# Altium PCB Type-C Tester.PcbDoc (part 1 of 2)
Units mil, origin at the board's own origin, x right, y up, seen from the top; angles counter-clockwise.
Board outline 1977.45 x 1150.64 mil, 2 copper layers (Top Layer, Bottom Layer); 31 components, 22 nets, 168 pads, 38 vias.
Unrouted connection lines stored in the file: 2.
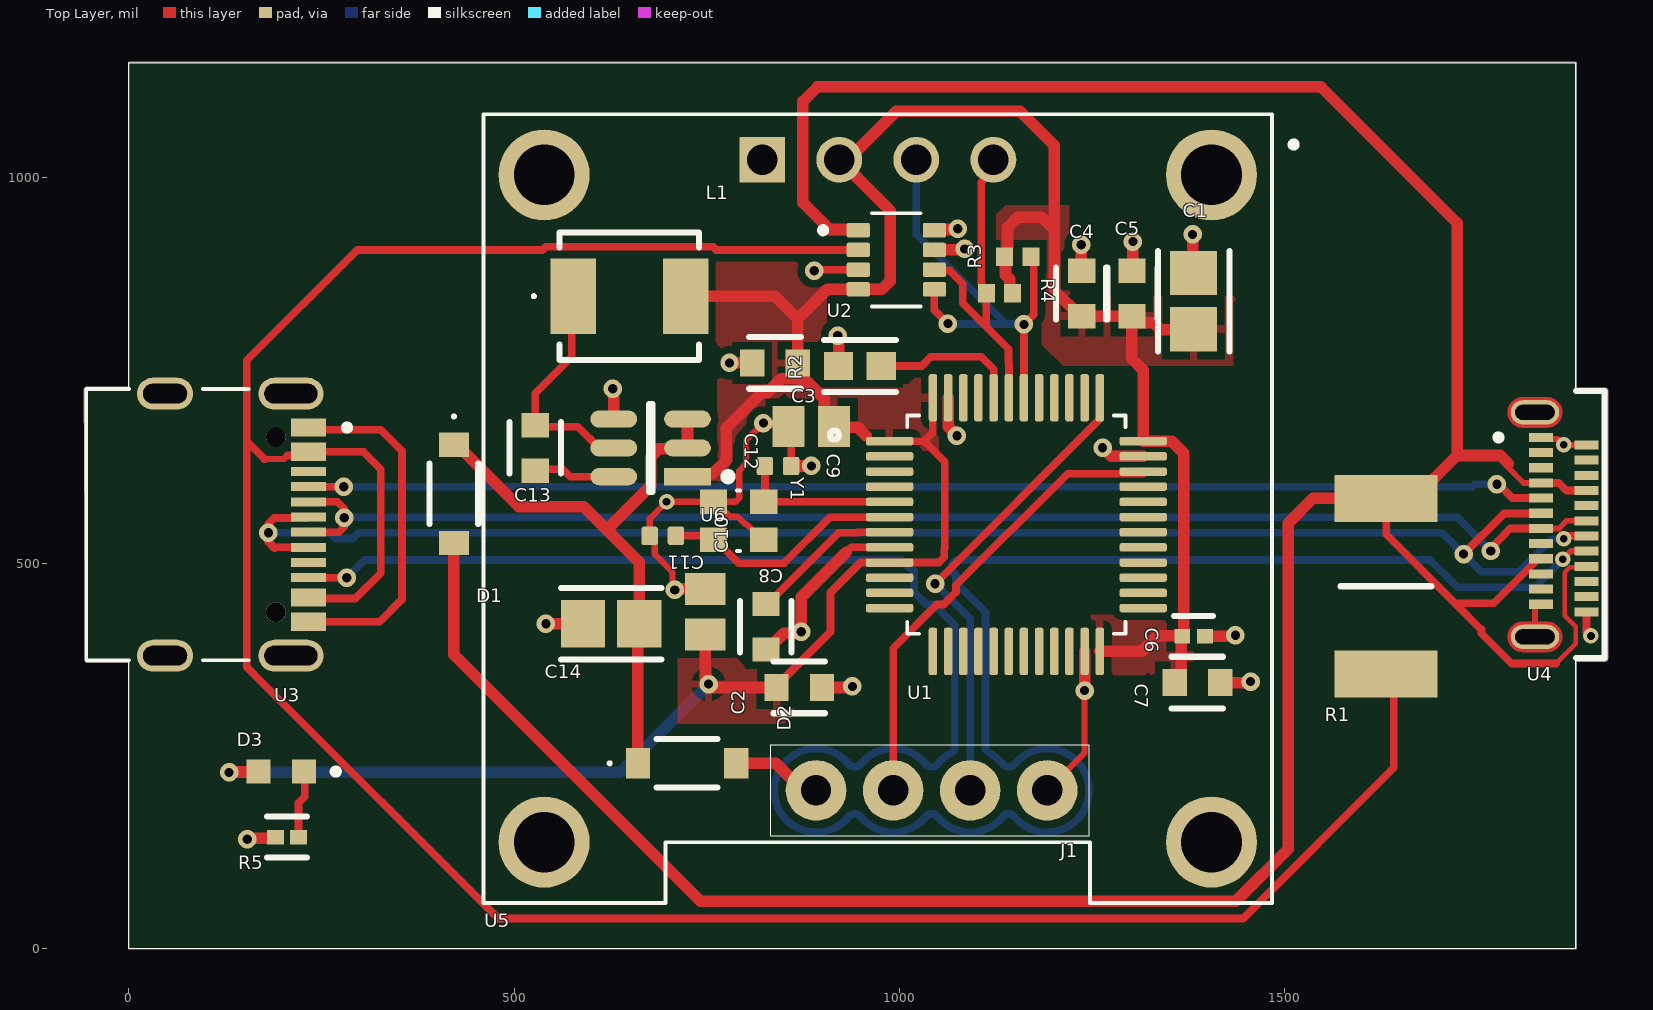
[diagram p0: Top Layer view]
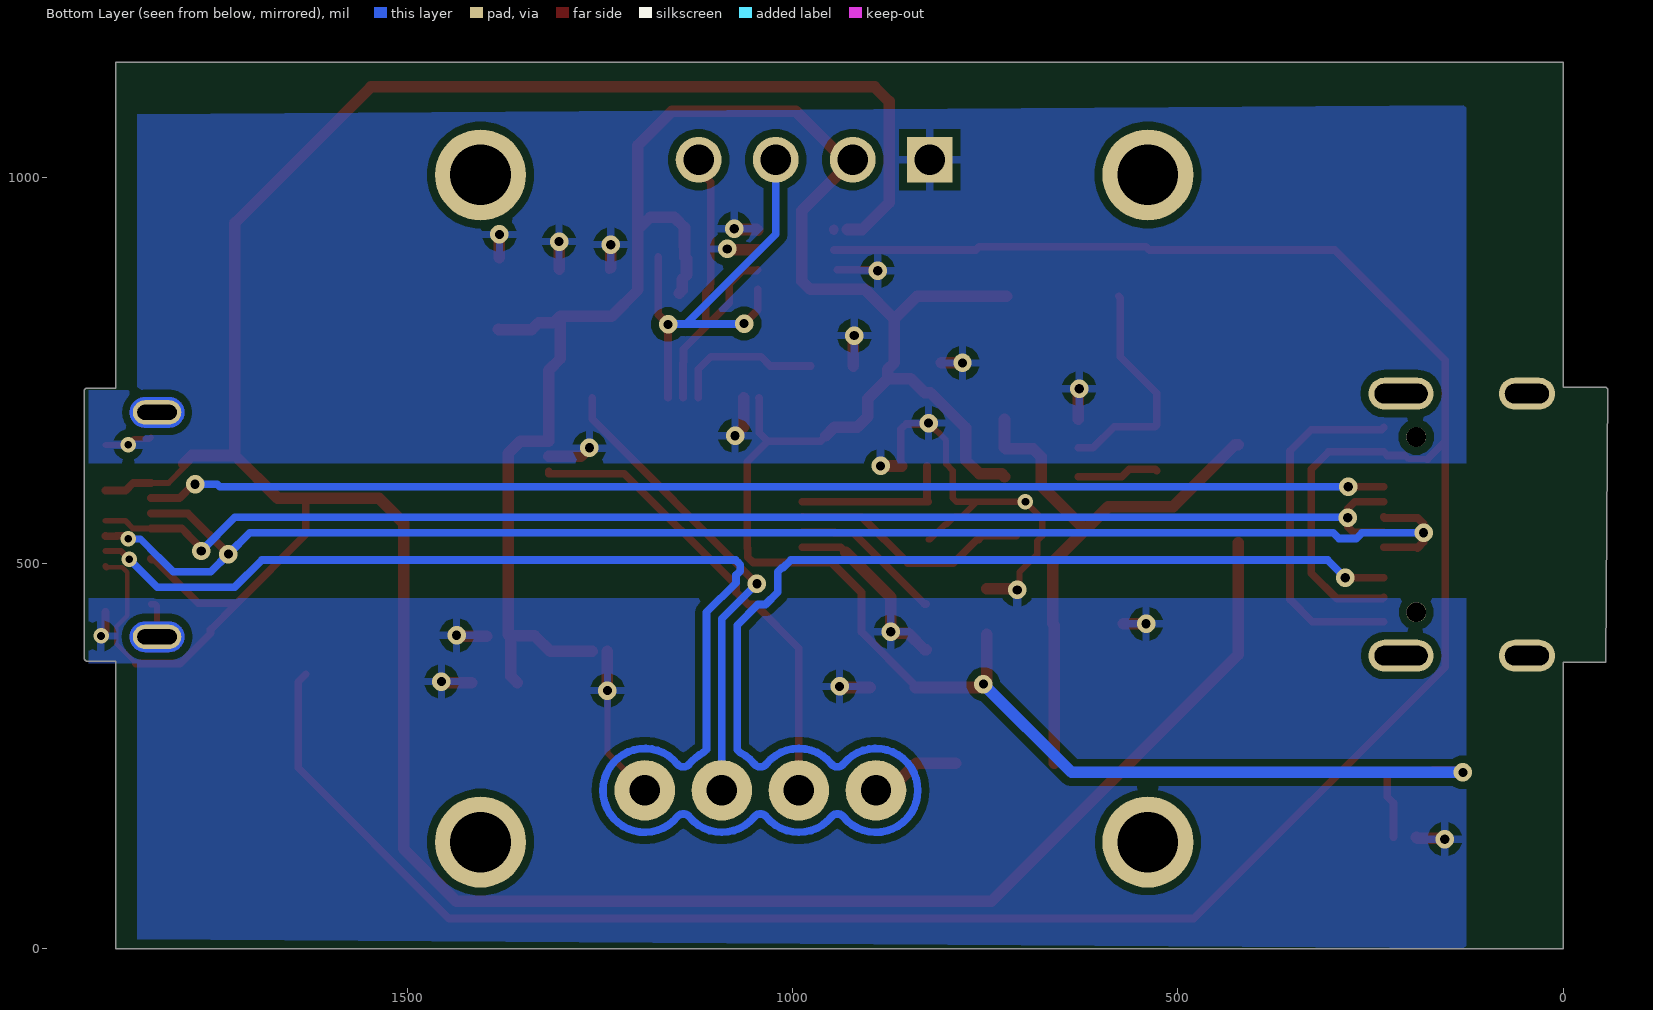
[diagram p1: Bottom Layer view, seen from below]
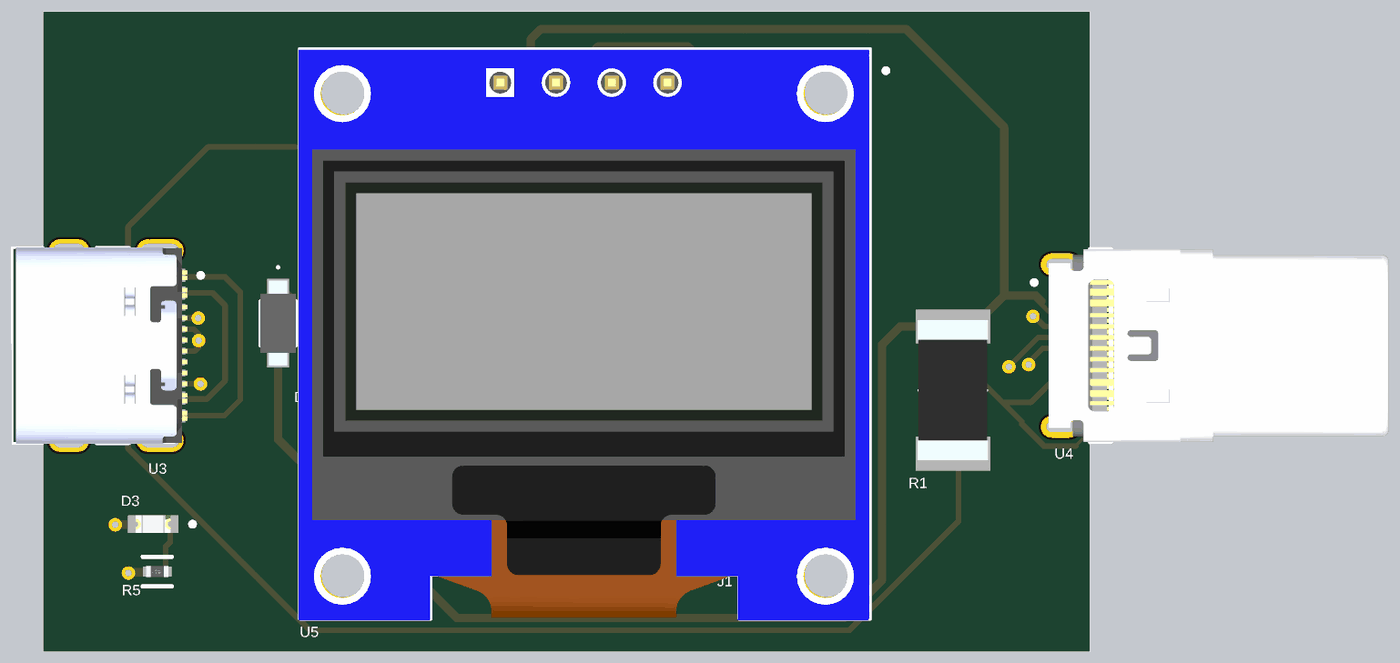
[diagram p2: 3D render of the assembled board from above, using the file's embedded part models]

## Layer stack, top to bottom
Top Solder: solder mask 0.4, Solder Resist, Dk 3.5
Top Layer: signal copper 1.4
Dielectric 1: dielectric 12.6, FR-4, Dk 4.8
Bottom Layer: signal copper 1.4
Bottom Solder: solder mask 0.4, Solder Resist, Dk 3.5

## Board outline
-55.47,371.5 -0.52,371.5 -0.52,0 0,-0.51 1878.11,-0.51 1878.62,0 1878.62,372.82 1915.51,372.82 ccw(c1915.51,376.77) 1919.46,376.77 1919.46,723.23 ccw(c1915.51,723.23) 1915.51,727.18 1878.62,727.18 1878.62,1149.61 1878.11,1150.12 0,1150.12 -0.52,1149.61 -0.52,728.5 -55.47,728.5 -57.99,725.98

## Design rules (kind name [scope] priority, off if disabled: settings)
Clearance [All] p1: gap=10 ignorepadtopadclearanceinfootprint=TRUE except(3.94: SMDPad-SMDPad)
PolygonConnect [All] p1: connectstyle=Relief reliefconductorwidth=10 reliefentries=4 polygonreliefangle="90 Angle" airgapwidth=10
RoutingVias [All] p1: holewidth=12 width=24 viastyle="Through Hole" minholewidth=10 minwidth=20 maxholewidth=34 maxwidth=50
SolderMaskExpansion [All] p1: expansion=0 istentingtop=FALSE
SupplyNets "Schematic Supply Nets_2" [InNet('GND')] p1: voltage=0.000
SupplyNets "Schematic Supply Nets_1" [InNet('+3.3V')] p2: voltage=0.000
SupplyNets "Schematic Supply Nets" [InNet('VIN')] p3: voltage=0.000
Width [All] p1: maxlimit=20 minlimit=6 preferedwidth=10
30 further rules are at their usual default settings.

## Components (designator, comment, footprint, x,y, rotation, side; value= is the part's Value field where it differs from the comment)
C1 "10uF" FP-GRM21B-0_2-e0_2_0_7-IPC_A 1381.89,840 r90 top
C2 "CC0603KRX7R9BB104" FP-CC0603-DA-MFG 870.08,338.58 r180 top value="100 nF"
C3 "CC0603KRX7R9BB104" FP-CC0603-DA-MFG 838.58,759.84 r0 top value="100 nF"
C4 "CC0603KRX7R9BB104" FP-CC0603-DA-MFG 1236.89,850 r270 top value="100 nF"
C5 "CC0603KRX7R9BB104" FP-CC0603-DA-MFG 1301.89,850 r270 top value="100 nF"
C6 "CL05B103KB5NNNC" FP-CL165-IPC_C 1381.89,405 r0 top
C7 "CC0603KRX5R9BB105" FP-CC0603-DA-MFG 1386.89,345 r0 top value="1 uF"
C8 "CC0603KRX7R9BB104" FP-CC0603-DA-MFG 826.77,417.32 r90 top value="100 nF"
C9 "CL05C100JB5NNNC" CAPC1005X55N 842.52,625.98 r180 top value=10p
C10 "CL05C100JB5NNNC" CAPC1005X55N 692.91,535.43 r0 top value=10p
C11 "CL21A226MAQNNNE" CAPC2013X140X45LL15T25 748.03,437.01 r270 top
C12 "CL21A226MAQNNNE" CAPC2013X140X45LL15T25 885.83,677.17 r0 top
C13 "CC0603KRX7R9BB104" FP-CC0603-DA-MFG 527.56,649.61 r90 top value="100 nF"
C14 "10uF" FP-GRM21B-0_2-e0_2_0_7-IPC_A 625.98,421.26 r180 top
D1 "B5819WSL-TP" B5819WSL 421.89,590 r270 top
D2 "B5819WSL-TP" B5819WSL 724.41,240.16 r0 top
D3 "RED" LED_KT-0603R 197.63,229.49 r180 top
J1 "SWD" SWD 891.89,205 r0 top
L1 "4.7μH" SMMS04204R7M 649.61,846.46 r0 top
R1 "50mOhm" RESC6432X110N 1631.89,470 r270 top
R2 "10K" FP-TFCR0603-IPC_B 948.82,755.91 r0 top
R3 "2K2" RESC1005X40N 1153.54,897.64 r0 top
R4 "2K2" RESC1005X40N 1129.92,850.39 r180 top
R5 "CRGCQ0402F1K0" FP-CRGCQ0402-IPC_C 205.2,144.38 r0 top value=1KΩ
U1 "STM32F103C8T6" QFP50P900X900X160-48N 1151.89,550 r0 top locked
U2 "INA219AIDCNR" SOT65P280X145-8N 996.06,893.7 r0 top
U3 "KH-TYPE-C-16P" KINGHELM_KH-TYPE-C-16P 46.89,550 r270 top
U4 "USB4155-03-C" GCT_USB4155-03-C_REVA 1862.36,550 r90 top locked
U5 "OLED" MODULE_DM-OLED096-636 972.05,570.87 r0 top locked
U6 "AP63203WU-7" FP-TSOT26-IPC_A 677.17,649.61 r180 top
Y1 "16MHz" XTAL_ABM10-16.000MHZ-D30-T3 791.34,555.12 r270 top

## Footprints (in the part's own frame and the unit in brackets; to place one, negate y for a bottom-side part, rotate by r counter-clockwise, add the part's x,y. Pads: shape width x height; smd on the part's side, far side on the other; paste and mask are expansions set on the pad)
B5819WSL [mm]
  rect 0.8x1 smd: 1(-1.62,0) 2(1.62,0)
  silkscreen extent -2.6,-0.8 1,0.8, body extent -1.94,-0.8 1.94,0.8, height 1.35
CAPC1005X55N [mm]
  rrect25% 0.54x0.6 smd: 1(-0.432,0) 2(0.432,0)
  body extent -0.5,-0.25 0.5,0.25, height 0.55
CAPC2013X140X45LL15T25 [mm] "Chip Capacitor, 2-Leads, Body 2.00x1.25mm, IPC High Density"
  rect 1.05x1.35 smd: 1(-0.75,0) 2(0.75,0)
  body extent -1.08,-0.7 1.07,0.7, height 1.4
FP-CC0603-DA-MFG [mm]
  rect 0.8x0.9 smd paste+0 mask+0: 1(-0.75,0) 2(0.75,0)
  silkscreen extent -0.85,-0.85 0.85,0.85, body extent -0.8,-0.4 0.8,0.4, height 0.9
FP-CL165-IPC_C [mil]
  rect 20.29x18.6 smd paste+0 mask+0: 1(-14.9,0) 2(14.9,0)
  silkscreen extent -25,-27 25,27, body extent -20,-10 20,10, height 22
FP-CRGCQ0402-IPC_C [mil]
  rect 22.03x18.6 smd paste+0 mask+0: 1(-14.81,0) 2(14.81,0)
  silkscreen extent -26,-27 26,27, body extent -30,-15 30,15, height 10
FP-GRM21B-0_2-e0_2_0_7-IPC_A [mil]
  rect 57.27x61.27 smd paste+0 mask+0: 1(-36.45,0) 2(36.45,0)
  silkscreen extent -65,-46 65,46, body extent -39,-25 39,25, height 57
FP-TFCR0603-IPC_B [mil]
  rect 37.72x35.91 smd paste+0 mask+0: 1(-27.64,0) 2(27.64,0)
  silkscreen extent -46,-34 46,34, body extent -31,-16 31,16, height 22
FP-TSOT26-IPC_A [mm]
  rect 1.54x0.566 smd paste+0 mask+0: 1(-1.216,0.95)
  rrect100% 1.54x0.566 smd paste+0 mask+0: 2(-1.216,0) 3(-1.216,-0.95) 4(1.216,-0.95) 5(1.216,0) 6(1.216,0.95)
  silkscreen extent -2.68,-1.45 0.05,1.45, body extent -1.4,-1.45 1.4,1.45, height 1
GCT_USB4155-03-C_REVA [mm]
  rect 0.3x0.8 smd: A1(2.875,0.75) A2(2.375,0.75) A3(1.875,0.75) A4(1.375,0.75) A5(0.875,0.75) A6(0.375,0.75) A7(-0.125,0.75) A8(-0.625,0.75) A9(-1.125,0.75) A10(-1.625,0.75) A11(-2.125,0.75) A12(-2.625,0.75) B1(-2.875,-0.75) B2(-2.375,-0.75) B3(-1.875,-0.75) B4(-1.375,-0.75) B5(-0.875,-0.75) B6(-0.375,-0.75) B7(0.125,-0.75) B8(0.625,-0.75) B9(1.125,-0.75) B10(1.625,-0.75) B11(2.125,-0.75) B12(2.625,-0.75)
  oval 0.8x1.6 hole 0.5 slot 1.3 at 90 deg mask+0: S1(-3.7,0.95) S2(3.7,0.95)
  Top Layer region: -3.674,1.849 -3.648,1.847 -3.622,1.844 -3.596,1.839 -3.571,1.833 -3.545,1.826 -3.521,1.817 -3.497,1.807 -3.473,1.796 -3.45,1.783 -3.428,1.769 -3.406,1.755 -3.385,1.739 -3.365,1.722 -3.346,1.704 -3.328,1.685 -3.311,1.665 -3.295,1.644 -3.281,1.622 -3.267,1.6 -3.254,1.577 -3.243,1.553 -3.233,1.529 -3.224,1.505 -3.217,1.479 -3.211,1.454 -3.206,1.428 -3.203,1.402 -3.201,1.376 -3.2,1.35 -3.2,0.55 -3.201,0.524 -3.203,0.498 -3.206,0.472 -3.211,0.446 -3.217,0.421 -3.224,0.395 -3.233,0.371 -3.243,0.347 -3.254,0.323 -3.267,0.3 -3.281,0.278 -3.295,0.256 -3.311,0.235 -3.328,0.215 -3.346,0.196 -3.365,0.178 -3.385,0.161 -3.406,0.145 -3.428,0.131 -3.45,0.117 -3.473,0.104 -3.497,0.093 -3.521,0.083 -3.545,0.074 -3.571,0.067 -3.596,0.061 -3.622,0.056 -3.648,0.053 -3.674,0.051 -3.7,0.05 -3.726,0.051 -3.752,0.053 -3.778,0.056 -3.804,0.061 -3.829,0.067 -3.855,0.074 -3.879,0.083 -3.903,0.093 -3.927,0.104 -3.95,0.117 -3.972,0.131 -3.994,0.145 -4.015,0.161 -4.035,0.178 -4.054,0.196 -4.072,0.215 -4.089,0.235 -4.105,0.256 -4.119,0.278 -4.133,0.3 -4.146,0.323 -4.157,0.347 -4.167,0.371 -4.176,0.395 -4.183,0.421 -4.189,0.446 -4.194,0.472 -4.197,0.498 -4.199,0.524 -4.2,0.55 -4.2,1.35 -4.199,1.376 -4.197,1.402 -4.194,1.428 -4.189,1.454 -4.183,1.479 -4.176,1.505 -4.167,1.529 -4.157,1.553 -4.146,1.577 -4.133,1.6 -4.119,1.622 -4.105,1.644 -4.089,1.665 -4.072,1.685 -4.054,1.704 -4.035,1.722 -4.015,1.739 -3.994,1.755 -3.972,1.769 -3.95,1.783 -3.927,1.796 -3.903,1.807 -3.879,1.817 -3.855,1.826 -3.829,1.833 -3.804,1.839 -3.778,1.844 -3.752,1.847 -3.726,1.849 -3.7,1.85
  Top Layer region: 3.726,1.849 3.752,1.847 3.778,1.844 3.804,1.839 3.829,1.833 3.855,1.826 3.879,1.817 3.903,1.807 3.927,1.796 3.95,1.783 3.972,1.769 3.994,1.755 4.015,1.739 4.035,1.722 4.054,1.704 4.072,1.685 4.089,1.665 4.105,1.644 4.119,1.622 4.133,1.6 4.146,1.577 4.157,1.553 4.167,1.529 4.176,1.505 4.183,1.479 4.189,1.454 4.194,1.428 4.197,1.402 4.199,1.376 4.2,1.35 4.2,0.55 4.199,0.524 4.197,0.498 4.194,0.472 4.189,0.446 4.183,0.421 4.176,0.395 4.167,0.371 4.157,0.347 4.146,0.323 4.133,0.3 4.119,0.278 4.105,0.256 4.089,0.235 4.072,0.215 4.054,0.196 4.035,0.178 4.015,0.161 3.994,0.145 3.972,0.131 3.95,0.117 3.927,0.104 3.903,0.093 3.879,0.083 3.855,0.074 3.829,0.067 3.804,0.061 3.778,0.056 3.752,0.053 3.726,0.051 3.7,0.05 3.674,0.051 3.648,0.053 3.622,0.056 3.596,0.061 3.571,0.067 3.545,0.074 3.521,0.083 3.497,0.093 3.473,0.104 3.45,0.117 3.428,0.131 3.406,0.145 3.385,0.161 3.365,0.178 3.346,0.196 3.328,0.215 3.311,0.235 3.295,0.256 3.281,0.278 3.267,0.3 3.254,0.323 3.243,0.347 3.233,0.371 3.224,0.395 3.217,0.421 3.211,0.446 3.206,0.472 3.203,0.498 3.201,0.524 3.2,0.55 3.2,1.35 3.201,1.376 3.203,1.402 3.206,1.428 3.211,1.454 3.217,1.479 3.224,1.505 3.233,1.529 3.243,1.553 3.254,1.577 3.267,1.6 3.281,1.622 3.295,1.644 3.311,1.665 3.328,1.685 3.346,1.704 3.365,1.722 3.385,1.739 3.406,1.755 3.428,1.769 3.45,1.783 3.473,1.796 3.497,1.807 3.521,1.817 3.545,1.826 3.571,1.833 3.596,1.839 3.622,1.844 3.648,1.847 3.674,1.849 3.7,1.85
  Bottom Layer region: -3.674,1.849 -3.648,1.847 -3.622,1.844 -3.596,1.839 -3.571,1.833 -3.545,1.826 -3.521,1.817 -3.497,1.807 -3.473,1.796 -3.45,1.783 -3.428,1.769 -3.406,1.755 -3.385,1.739 -3.365,1.722 -3.346,1.704 -3.328,1.685 -3.311,1.665 -3.295,1.644 -3.281,1.622 -3.267,1.6 -3.254,1.577 -3.243,1.553 -3.233,1.529 -3.224,1.505 -3.217,1.479 -3.211,1.454 -3.206,1.428 -3.203,1.402 -3.201,1.376 -3.2,1.35 -3.2,0.55 -3.201,0.524 -3.203,0.498 -3.206,0.472 -3.211,0.446 -3.217,0.421 -3.224,0.395 -3.233,0.371 -3.243,0.347 -3.254,0.323 -3.267,0.3 -3.281,0.278 -3.295,0.256 -3.311,0.235 -3.328,0.215 -3.346,0.196 -3.365,0.178 -3.385,0.161 -3.406,0.145 -3.428,0.131 -3.45,0.117 -3.473,0.104 -3.497,0.093 -3.521,0.083 -3.545,0.074 -3.571,0.067 -3.596,0.061 -3.622,0.056 -3.648,0.053 -3.674,0.051 -3.7,0.05 -3.726,0.051 -3.752,0.053 -3.778,0.056 -3.804,0.061 -3.829,0.067 -3.855,0.074 -3.879,0.083 -3.903,0.093 -3.927,0.104 -3.95,0.117 -3.972,0.131 -3.994,0.145 -4.015,0.161 -4.035,0.178 -4.054,0.196 -4.072,0.215 -4.089,0.235 -4.105,0.256 -4.119,0.278 -4.133,0.3 -4.146,0.323 -4.157,0.347 -4.167,0.371 -4.176,0.395 -4.183,0.421 -4.189,0.446 -4.194,0.472 -4.197,0.498 -4.199,0.524 -4.2,0.55 -4.2,1.35 -4.199,1.376 -4.197,1.402 -4.194,1.428 -4.189,1.454 -4.183,1.479 -4.176,1.505 -4.167,1.529 -4.157,1.553 -4.146,1.577 -4.133,1.6 -4.119,1.622 -4.105,1.644 -4.089,1.665 -4.072,1.685 -4.054,1.704 -4.035,1.722 -4.015,1.739 -3.994,1.755 -3.972,1.769 -3.95,1.783 -3.927,1.796 -3.903,1.807 -3.879,1.817 -3.855,1.826 -3.829,1.833 -3.804,1.839 -3.778,1.844 -3.752,1.847 -3.726,1.849 -3.7,1.85
  Bottom Layer region: 3.726,1.849 3.752,1.847 3.778,1.844 3.804,1.839 3.829,1.833 3.855,1.826 3.879,1.817 3.903,1.807 3.927,1.796 3.95,1.783 3.972,1.769 3.994,1.755 4.015,1.739 4.035,1.722 4.054,1.704 4.072,1.685 4.089,1.665 4.105,1.644 4.119,1.622 4.133,1.6 4.146,1.577 4.157,1.553 4.167,1.529 4.176,1.505 4.183,1.479 4.189,1.454 4.194,1.428 4.197,1.402 4.199,1.376 4.2,1.35 4.2,0.55 4.199,0.524 4.197,0.498 4.194,0.472 4.189,0.446 4.183,0.421 4.176,0.395 4.167,0.371 4.157,0.347 4.146,0.323 4.133,0.3 4.119,0.278 4.105,0.256 4.089,0.235 4.072,0.215 4.054,0.196 4.035,0.178 4.015,0.161 3.994,0.145 3.972,0.131 3.95,0.117 3.927,0.104 3.903,0.093 3.879,0.083 3.855,0.074 3.829,0.067 3.804,0.061 3.778,0.056 3.752,0.053 3.726,0.051 3.7,0.05 3.674,0.051 3.648,0.053 3.622,0.056 3.596,0.061 3.571,0.067 3.545,0.074 3.521,0.083 3.497,0.093 3.473,0.104 3.45,0.117 3.428,0.131 3.406,0.145 3.385,0.161 3.365,0.178 3.346,0.196 3.328,0.215 3.311,0.235 3.295,0.256 3.281,0.278 3.267,0.3 3.254,0.323 3.243,0.347 3.233,0.371 3.224,0.395 3.217,0.421 3.211,0.446 3.206,0.472 3.203,0.498 3.201,0.524 3.2,0.55 3.2,1.35 3.201,1.376 3.203,1.402 3.206,1.428 3.211,1.454 3.217,1.479 3.224,1.505 3.233,1.529 3.243,1.553 3.254,1.577 3.267,1.6 3.281,1.622 3.295,1.644 3.311,1.665 3.328,1.685 3.346,1.704 3.365,1.722 3.385,1.739 3.406,1.755 3.428,1.769 3.45,1.783 3.473,1.796 3.497,1.807 3.521,1.817 3.545,1.826 3.571,1.833 3.596,1.839 3.622,1.844 3.648,1.847 3.674,1.849 3.7,1.85
  silkscreen extent -4.4,-1.35 4.4,2.25, body extent -4.4,-14 4.4,1.5, height 1.45
KINGHELM_KH-TYPE-C-16P [mm]
  rect 0.6x1.15 smd paste+0 mask+0: A1B12(-3.2,4.725) A4B9(-2.4,4.725) A9B4(2.4,4.725) A12B1(3.2,4.725)
  rect 0.3x1.15 smd paste+0 mask+0: A5(-1.25,4.725) A6(-0.25,4.725) A7(0.25,4.725) A8(1.25,4.725) B5(1.75,4.725) B6(0.75,4.725) B7(-0.75,4.725) B8(-1.75,4.725)
  oval 1.05x1.85 hole 0.65 slot 1.45 at 90 deg mask+0.102: SH1(-4.32,0) SH2(4.32,0)
  oval 1.05x2.15 hole 0.65 slot 1.75 at 90 deg mask+0.102: SH3(-4.32,4.15) SH4(4.32,4.15)
  round 0.65 hole 0.65 unplated mask+0: ""(-2.89,3.65) ""(2.89,3.65)
  silkscreen extent -4.47,-2.6 4.47,6.1, body extent -4.47,-2.41 4.47,5.41, height 3.41
LED_KT-0603R [mm]
  rect 0.8x0.8 smd: A(0.75,0) C(-0.75,0)
  silkscreen extent -1.9,-0.1 -1.7,0.1, body extent -0.8,-0.4 0.8,0.4, height 0.65
MODULE_DM-OLED096-636 [mm]
  rect 1.508x1.508 / inner round 1.508 / far side rect 1.508x1.508 hole 1: 1(-3.81,11.5)
  round 1.508 hole 1: 2(-1.27,11.5) 3(1.27,11.5) 4(3.81,11.5)
  round 3 hole 2: S1(-11,11) S2(11,11) S3(11,-11) S4(-11,-11)
  silkscreen extent -13,-13 13.81,13, body extent -13.05,-13.05 12.95,12.95, height 5.66
QFP50P900X900X160-48N [mm]
  rrect50% 1.56x0.28 smd: 1(-4.18,2.75) 2(-4.18,2.25) 3(-4.18,1.75) 4(-4.18,1.25) 5(-4.18,0.75) 6(-4.18,0.25) 7(-4.18,-0.25) 8(-4.18,-0.75) 9(-4.18,-1.25) 10(-4.18,-1.75) 11(-4.18,-2.25) 12(-4.18,-2.75) 25(4.18,-2.75) 26(4.18,-2.25) 27(4.18,-1.75) 28(4.18,-1.25) 29(4.18,-0.75) 30(4.18,-0.25) 31(4.18,0.25) 32(4.18,0.75) 33(4.18,1.25) 34(4.18,1.75) 35(4.18,2.25) 36(4.18,2.75)
  rrect50% 0.28x1.56 smd: 13(-2.75,-4.18) 14(-2.25,-4.18) 15(-1.75,-4.18) 16(-1.25,-4.18) 17(-0.75,-4.18) 18(-0.25,-4.18) 19(0.25,-4.18) 20(0.75,-4.18) 21(1.25,-4.18) 22(1.75,-4.18) 23(2.25,-4.18) 24(2.75,-4.18) 37(2.75,4.18) 38(2.25,4.18) 39(1.75,4.18) 40(1.25,4.18) 41(0.75,4.18) 42(0.25,4.18) 43(-0.25,4.18) 44(-0.75,4.18) 45(-1.25,4.18) 46(-1.75,4.18) 47(-2.25,4.18) 48(-2.75,4.18)
  silkscreen extent -6.15,-3.6 3.6,3.6, body extent -4.5,-4.48 4.5,4.52, height 1.48
RESC1005X40N [mm]
  rect 0.56x0.6 smd: 1(-0.435,0) 2(0.435,0)
  body extent -0.5,-0.25 0.5,0.25, height 0.35
RESC6432X110N [mm]
  rect 1.55x3.4 smd: 1(-2.9,0) 2(2.9,0)
  silkscreen extent 0,-1.5 0,1.5, body extent -3.2,-1.6 3.2,1.6, height 1.1
SMMS04204R7M [mm]
  rect 1.5x2.5 smd: 1(-1.85,0) 2(1.85,0)
  silkscreen extent -3.2,-2.1 2.3,2.1, body extent -2.45,-2.1 2.45,2.1, height 2.1
SOT65P280X145-8N [mm]
  rrect25% 0.762x0.48 smd: 1(-1.255,0.975) 2(-1.255,0.325) 3(-1.255,-0.325) 4(-1.255,-0.975) 5(1.255,-0.975) 6(1.255,-0.325) 7(1.255,0.325) 8(1.255,0.975)
  silkscreen extent -2.51,-1.54 0.8,1.53, body extent -1.4,-1.45 1.4,1.45, height 1.45
SWD [mm]
  round 2 hole 1: 1(0,0) 2(2.54,0) 3(5.08,0) 4(7.62,0)
  silkscreen extent -1.5,-1.5 9,1.5
XTAL_ABM10-16.000MHZ-D30-T3 [mm]
  rect 0.8x0.9 smd: 1(-0.625,0.825) 2(-0.625,-0.825) 3(0.625,-0.825) 4(0.625,0.825)
  silkscreen extent -1,-0.06 1,0.06, body extent -1.25,-1 1.25,1, height 0.7

## Part data
C1 C14: library part CMP-06035-004402-1, "Chip Multilayer Ceramic Capacitors for General Purpose, 0805, 10uF, X5R, 15%, 10%, 50V", Dielectric=X5R, LCSC PART=C440198, Tolerance=10%, Voltage Rating (DC)=50V, Capacitance=10uF, Length=2mm, Thickness=1.25mm, Width=1.25mm
C2 C3 C4 C5 C8 C13: library part CMP-2100-03601-2, "CAP CER 0.1UF 50V X7R 0603", Capacitance="100 nF", LCSC PART=C14663, Manufacturer=YAGEO, Package=CC0603-DA, Temperature="-55°C to +125°C", Temperature Characteristic=X7R, Temperature Coefficient=15%, Temperature Range High=+125°C, Temperature Range Low=-55°C, Tolerance=0.1, Voltage="50 V", Automotive=No, Category=Cap, ComponentLink2Description=Datasheet, ComponentLink2URL=http://www.yageo.com/documents/recent/UPY-GPHC_X7R_6.3V-to-50V_18.pdf, Device Class L1="Passive Components", Device Class L2=Capacitors, Device Class L3="Ceramic Capacitors", Digikey Description="CAP CER 0.1UF 50V X7R 0603", Footprint Url=http://www.yageo.com/exep/pages/download/literatures/UPY-C_GEN_24.pdf, Height=0.9mm, Lead Free=Yes, Manufacturer Part Number=CC0603KRX7R9BB104, Material=Ceramic, Mouser Description="Multilayer Ceramic Capacitor, CC Series, 0.1 - F, - 10%, X7R, 50 V, 0603 [1608 Metric]", Octopart=https://octopart.com/cc0603krx7r9bb104-yageo-42244635, RoHS=TRUE, Voltage Rating="50 V"
C6: library part CMP-13271-000387-1, "Cap Ceramic 10nF 50V X7R ±10% SMD 0402 +125°C Paper T/R", Capacitance=10nF, Case Code (Imperial)=0402, Case Code (Metric)=1005, Dielectric=X7R, Max Operating Temperature=125°C, Min Operating Temperature=-55°C, Package Quantity=1, Tolerance=10%, Voltage=50V, Case/Package=0402, Contact Plating=Tin, Depth=0.5mm, Height=0.5mm, Lead Free="Lead Free", Length=1mm, Material=Ceramic, Mount="Surface Mount", Packaging="Tape and Reel", Radiation Hardening=No, Thickness=0.022inch, Voltage Rating=50V, Voltage Rating (DC)=50V, Width=0.02inch
C7: library part CMP-03422-001112-1, "CAP CER 1UF 50V X5R 0603", Capacitance="1 uF", Manufacturer=YAGEO, Package=CC0603-DA, Temperature="-55°C to +125°C", Temperature Characteristic=X5R, Temperature Coefficient=15%, Temperature Range High=+125°C, Temperature Range Low=-55°C, Tolerance=0.1, Voltage="50 V", Automotive=No, Category=Cap, ComponentLink2Description=Datasheet, ComponentLink2URL=http://www.yageo.com/documents/recent/UPY-GPHC_X7R_6.3V-to-50V_18.pdf, Device Class L1="Passive Components", Device Class L2=Capacitors, Device Class L3="Ceramic Capacitors", Digikey Description="CAP CER 1UF 50V X5R 0603", Footprint Url=http://www.yageo.com/exep/pages/download/literatures/UPY-C_GEN_24.pdf, Height=0.9mm, Lead Free=Yes, Manufacturer Part Number=CC0603KRX5R9BB105, Material=Ceramic, Mouser Description="Multilayer Ceramic Capacitors MLCC - SMD/SMT 1M pF 10% 50 Volts", Octopart=https://octopart.com/cc0603krx5r9bb105-yageo-48690813, RoHS=TRUE, Voltage Rating="50 V"
C9 C10: "10 pF Â±5% 50V Ceramic Capacitor C0G, NP0 0402 (1005 Metric)", Package="SMD-2-2 Samsung", Check_prices=https://www.snapeda.com/parts/CL05C100JB5NNNC/Samsung/view-part/?ref=eda, MF="Samsung Electro-Mechanics", MP=CL05C100JB5NNNC, SnapEDA_Link=https://www.snapeda.com/parts/CL05C100JB5NNNC/Samsung/view-part/?ref=snap
C11 C12: library part CMP-2000-06104-1, "Multi-layer Ceramic Capacitor, 22 uF, -55 to 85 degC, 2-Pin SMD (0805), RoHS, Tape and Reel", Capacitance=22µF, LCSC PART=C45783, Manufacturer="Samsung Electro-Mechanics", Operating Temperature=-55°C~85°C, Package / Case=0805(2012Metric), Package Description="2-Pin Surface Mount Device, Body 2.0 x 1.25 mm", Package Reference=0805, Ratings=-, Standard Package=2,000, Temperature Coefficient=X5R, Tolerance=±20%, Voltage - Rated=25V, Applications=GeneralPurpose, Category=Capacitors, Datasheet URL=http://datasheet.octopart.com/CL21A226MAQNNNE-Samsung-datasheet-48647558.pdf, Datasheet Version=07/2015, Family=CeramicCapacitors, Featured Product=Multi-LayerCeramicCapacitors, Features=-, Height - Seated (Max)=-, Lead Spacing=-, Lead Style=-, Manufacturer URL=http://www.samsungsem.com/global/index.jsp, Mounting Technology=SurfaceMount, Mounting Type=SurfaceMount,MLCC, Online Catalog=CLSeries,HighCapacitance, Other Names=1276-2908-2, Packaging=Tape&Reel(TR), Product Training Modules=HighCapMLCCFamily, RoHS Information=MLCCRoHS2Compliance, Series=CL, Size / Dimension="0.079\"Lx0.049\"W(2.00mmx1.25mm)", Thickness (Max)="0.055\"(1.40mm)"
D1 D2: "Rectifier Diode, Schottky, 1 Phase, 1 Element, 1A, 40V V(RRM), Silicon", Forward Voltage=600mV, Manufacturer=MCC, Max Forward Surge Current (Ifsm)=10A, Max Operating Temperature=125°C, Max Output current=1A, Max Power Dissipation=250mW, Min Operating Temperature=-65°C, Peak Reverse Current=50µA, Reverse Standoff Voltage=40V, Category="Rectifier Diodes", China RoHS=Compliant, Lifecycle Status=Production, Manufacturer Part Number=B5819WSL-TP, Number of Elements=1, Number of Terminals=2, Pricing="3000=0.0379, 9000=0.037, 15000=0.0366, 45000=0.0357, 75000=0.0349 (USD)", REACH SVHC=Unaffected, RoHS=Compliant, Stock=3000, Supplier="Future Electronics", Supplier Part Number=B5819WSL-TP
D3: library part KT-0603R, "Unchecked KT-0603R 615nm~630nm 120° 1.9V~2.2V red 0603 SMD mount 1.6mm*800μm*700μm Uncategorized"
L1: library part SMMS0420-4R7M, "Manufacturer Part Description Category Supply Info / Unchecked SMMS0420-4R7M 4.7μH ±20% 3A Inductor Uncategorized"
R1: library part HoJLR2512-2W-50mR-1%, "Unchecked HOJLR2512-2W-50MR-1% 2512 Alloy Resistor, 0.05Ω ±1%, 50ppm, 2W Chip SMD Resistors"
R2: library part CMP-250906-158435-1, "RES Thin Film,  10kΩ, 1%, 0.1W, 100ppm/°C, 0603"
R3 R4: library part 0402WGF2201TCE, "Unchecked RND 1550402WGF2201TCE SMD Resistor Dimensions L x W x H: 1 x 0.5 x 0.35 mm Temperature range: -55 ... 155 °C Construction form: 0402... Uncategorized      100ppm/°C"
R5: library part CMP-03211-006314-1, "CRGCQ0402 1KΩ 1% ±100ppm/°C 50V", Ambient Temperature Range High=+70°C, Manufacturer="TE Connectivity", Package=CRGCQ0402, Power Rating=0.0625W, Resistance=1KΩ, Temperature="-55°C to +155°C", Temperature Coefficient=±100ppm/°C, Temperature Range High=+155°C, Temperature Range Low=-55°C, Tolerance=0.01, Voltage Rating=50V, Automotive=Yes, Category=Res, ComponentLink2Description=Datasheet, ComponentLink2URL=https://www.te.com/commerce/DocumentDelivery/DDEController?Action=showdoc&DocId=Data+Sheet%7F1773204-3%7F1%7Fpdf%7FEnglish%7FENG_DS_1773204-3_1.pdf%7F4-2176347-694, Composition="Thick Film", Device Class L1="Passive Components", Device Class L2=Resistors, Device Class L3="Chip SMD Resistors", Height=0.4mm, Ipc Land Pattern Name=RESC10050X35, Lead Free=Yes, Manufacturer Part Number=CRGCQ0402F1K0, Octopart=https://octopart.com/crgcq0402f1k0-te+connectivity-91017946, RoHS=TRUE, Series=CRGCQ
U1: "MCU 32-bit STM32F1 ARM Cortex M3 RISC 64KB Flash 2.5V/3.3V 48-Pin LQFP Tray", Case/Package=LFQFP, Clock Frequency=72MHz, Manufacturer=STMicroelectronics, Manufacturer Package Identifier=ai14911d, Max Operating Temperature=85°C, Max Power Dissipation=363mW, Max Supply Current=50mA, Max Supply Voltage=3.6V, Min Operating Temperature=-40°C, Min Supply Voltage=2V, Nominal Supply Current=1.7µA, Nominal Supply Voltage (DC)=3.3V, Temperature Grade=Industrial, ADC Channels (Resolution)="10-Ch 12-Bit", Address Bus Width=32b, Category=Microcontrollers, China RoHS=Compliant, ComponentLink1Description=https://datasheet.octopart.com:443/STM32F103C8T6-STMicroelectronics-datasheet-177520228.pdf?src-supplier=IHS, ComponentLink1URL=https://datasheet.octopart.com:443/STM32F103C8T6-STMicroelectronics-datasheet-177520228.pdf?src-supplier=IHS, ComponentLink2Description=https://datasheet.octopart.com:443/STM32F103C8T6-STMicroelectronics-datasheet-10330614.pdf?src-supplier=Newark, ComponentLink2URL=https://datasheet.octopart.com:443/STM32F103C8T6-STMicroelectronics-datasheet-10330614.pdf?src-supplier=Newark, ComponentLink3Description=https://datasheet.octopart.com:443/STM32F103C8T6-STMicroelectronics-datasheet-16839800.pdf?src-supplier=Newark, ComponentLink3URL=https://datasheet.octopart.com:443/STM32F103C8T6-STMicroelectronics-datasheet-16839800.pdf?src-supplier=Newark, ComponentLink4Description=https://datasheet.octopart.com:443/STM32F103C8T6-STMicroelectronics-datasheet-48026265.pdf?src-supplier=ICpick, ComponentLink4URL=https://datasheet.octopart.com:443/STM32F103C8T6-STMicroelectronics-datasheet-48026265.pdf?src-supplier=ICpick, ComponentLink5Description=https://datasheet.octopart.com:443/STM32F103C8T6-STMicroelectronics-datasheet-14363502.pdf?src-supplier=Farnell, ComponentLink5URL=https://datasheet.octopart.com:443/STM32F103C8T6-STMicroelectronics-datasheet-14363502.pdf?src-supplier=Farnell, ComponentLink6Description=https://datasheet.octopart.com:443/STM32F103C8T6-STMicroelectronics-datasheet-500013.pdf?src-supplier=Farnell, ComponentLink6URL=https://datasheet.octopart.com:443/STM32F103C8T6-STMicroelectronics-datasheet-500013.pdf?src-supplier=Farnell, ComponentLink7Description=https://datasheet.octopart.com:443/STM32F103C8T6-STMicroelectronics-datasheet-8365036.pdf?src-supplier=Farnell, ComponentLink7URL=https://datasheet.octopart.com:443/STM32F103C8T6-STMicroelectronics-datasheet-8365036.pdf?src-supplier=Farnell, ComponentLink8Description=https://datasheet.octopart.com:443/STM32F103C8T6-STMicroelectronics-datasheet-6396519.pdf?src-supplier=Verical, ComponentLink8URL=https://datasheet.octopart.com:443/STM32F103C8T6-STMicroelectronics-datasheet-6396519.pdf?src-supplier=Verical, ComponentLink9Description=https://datasheet.octopart.com:443/STM32F103C8T6-STMicroelectronics-datasheet-21407612.pdf?src-supplier=element14+APAC, ComponentLink9URL=https://datasheet.octopart.com:443/STM32F103C8T6-STMicroelectronics-datasheet-21407612.pdf?src-supplier=element14+APAC, ComponentLink10Description=https://datasheet.octopart.com:443/STM32F103C8T6-STMicroelectronics-datasheet-8700640.pdf?src-supplier=element14, ComponentLink10URL=https://datasheet.octopart.com:443/STM32F103C8T6-STMicroelectronics-datasheet-8700640.pdf?src-supplier=element14, ComponentLink11Description=https://datasheet.octopart.com:443/STM32F103C8T6-STMicroelectronics-datasheet-165583531.pdf?src-supplier=SOS+electronic, ComponentLink11URL=https://datasheet.octopart.com:443/STM32F103C8T6-STMicroelectronics-datasheet-165583531.pdf?src-supplier=SOS+electronic, ComponentLink12Description=https://datasheet.octopart.com:443/STM32F103C8T6-STMicroelectronics-datasheet-14106722.pdf?src-supplier=iiiC, ComponentLink12URL=https://datasheet.octopart.com:443/STM32F103C8T6-STMicroelectronics-datasheet-14106722.pdf?src-supplier=iiiC, ComponentLink13Description=https://datasheet.octopart.com:443/STM32F103C8T6-STMicroelectronics-datasheet-17594274.pdf?src-supplier=TME, ComponentLink13URL=https://datasheet.octopart.com:443/STM32F103C8T6-STMicroelectronics-datasheet-17594274.pdf?src-supplier=TME, ComponentLink14Description=https://datasheet.octopart.com:443/STM32F103C8T6-STMicroelectronics-datasheet-148251.pdf?src-supplier=Nu+Horizons, ComponentLink14URL=https://datasheet.octopart.com:443/STM32F103C8T6-STMicroelectronics-datasheet-148251.pdf?src-supplier=Nu+Horizons, Core Architecture=ARM, Country of Origin=Malaysia, Data Bus Width=32b, Density=512kb, EEPROM Memory Size=0B, Export Control Classification Number (ECCN) Code=3A991.A.2, Flash Memory Size=64kB, Frequency=72MHz, Harmonized Tariff Schedule (HTS) Code=8542.31.00.25, Height=1.45mm, Height - Seated (Max)=1.6mm, Interface="CAN, USB", Introduction Date=2007-06-07, Lead Free="Lead Free", Length=7mm, Lifecycle Status=Production, Manufacturer Part Number=STM32F103C8T6, Memory Format=FLASH, Memory Size=64kB, Mounting Technology="Surface Mount", Number of A/D Converters=2, Number of ADC Channels=10, Number of Bits=32, Number of Channels=10, Number of I2C Channels=2, Number of I/Os=37, Number of Interrupts=16, Number of Programmable I/O=48, Number of PWM Channels=1, Number of SPI Channels=2, Number of Terminals=48, Number of Timers/Counters=4, Number of USART Channels=3, Operating Supply Voltage=3.6V, Oscillator Type=Internal, Peripherals="POR, RTC", Pins=48, Pricing="1=3.12425, 2=3.09755, 4=3.05349, 8=3.00943, 16=2.96537 (USD)", Radiation Hardening=No, RAM Size=20kB, REACH SVHC=Unaffected, RoHS=Compliant, Schedule B=8542310000, Stock=41822, Supplier=Avnet, Supplier Part Number=STM32F103C8T6, Terminal Pitch=500µm, Termination=SMD/SMT, Watchdog Timer=Yes, Width=7mm
U2: "26-V 12-bit I2C output digital power monitor 8-SOT-23 -40 to 125", Ambient Temperature Range High=85°C, Case/Package=SOT-23, Input Offset Voltage (Vos)=100µV, Manufacturer="Texas Instruments", Manufacturer Lifecycle Status=ACTIVE, Max Junction Temperature (Tj)=150°C, Max Operating Temperature=125°C, Max Supply Current=5mA, Max Supply Voltage=26V, Min Input Voltage=0V, Min Operating Temperature=-40°C, Min Supply Voltage=3V, Nominal Supply Current=700µA, Operating Supply Current=1mA, Output Current=10mA, Supplier Part Number=296-23770-1-ND, Accuracy=1%, Bandwidth=3.4MHz, Category="Amplifiers - Op Amps, Buffer, Instrumentation", Common Mode Rejection Ratio=100dB, ComponentLink1Description=https://octopart.com:443/opatz8j6/c1?t=mXNZEg2jyD5NyCK_2W6ogI_3c8QRMbRBOLazAHLgy1JlwbZKZyH4b-YuevEo30JEQiTWwC8lz5Tbu-S38pmh9-XLDsCQsNBNDFv0ZPtEAh9Vx9mmiMtTyAa81OfucU8wswp56Gsbxy1LDfR57SITMeoX1a13NcXQgownNrkx-3rEAjCgj7TNf5q988t_Bmtd28MfB-8YodPlVf_HWBaA_YkKbVFMmS-K4EDTzxfG14L7W23rjhR5wMtYaOji5q7itKD0VWsI_Pl-rAba6SpMOYnl8B8vEq--hemeyXquqfeQYa1YyvXap_3pa6lat1BXqCZqGMe0qTFNLIcuieQkNoJTlJe9aMEd3u-pqstJoCS5-cCrgu3PAF_v80BJAeKwFj4S&src-supplier=Texas+Instruments, ComponentLink1URL=https://octopart.com:443/opatz8j6/c1?t=mXNZEg2jyD5NyCK_2W6ogI_3c8QRMbRBOLazAHLgy1JlwbZKZyH4b-YuevEo30JEQiTWwC8lz5Tbu-S38pmh9-XLDsCQsNBNDFv0ZPtEAh9Vx9mmiMtTyAa81OfucU8wswp56Gsbxy1LDfR57SITMeoX1a13NcXQgownNrkx-3rEAjCgj7TNf5q988t_Bmtd28MfB-8YodPlVf_HWBaA_YkKbVFMmS-K4EDTzxfG14L7W23rjhR5wMtYaOji5q7itKD0VWsI_Pl-rAba6SpMOYnl8B8vEq--hemeyXquqfeQYa1YyvXap_3pa6lat1BXqCZqGMe0qTFNLIcuieQkNoJTlJe9aMEd3u-pqstJoCS5-cCrgu3PAF_v80BJAeKwFj4S&src-supplier=Texas+Instruments, ComponentLink2Description=https://datasheet.octopart.com:443/INA219AIDCNR-Texas-Instruments-datasheet-10383171.pdf?src-supplier=Texas+Instruments, ComponentLink2URL=https://datasheet.octopart.com:443/INA219AIDCNR-Texas-Instruments-datasheet-10383171.pdf?src-supplier=Texas+Instruments, ComponentLink3Description=https://datasheet.octopart.com:443/INA219AIDCNR-Texas-Instruments-datasheet-10258484.pdf?src-supplier=Texas+Instruments, ComponentLink3URL=https://datasheet.octopart.com:443/INA219AIDCNR-Texas-Instruments-datasheet-10258484.pdf?src-supplier=Texas+Instruments, ComponentLink4Description=https://sigma.octopart.com:443/49252122/technical_drawing/Texas-Instruments-INA219AIDCNR.pdf?src-supplier=Texas+Instruments, ComponentLink4URL=https://sigma.octopart.com:443/49252122/technical_drawing/Texas-Instruments-INA219AIDCNR.pdf?src-supplier=Texas+Instruments, ComponentLink5Description=https://datasheet.octopart.com:443/INA219AIDCNR-Texas-Instruments-datasheet-102489495.pdf?src-supplier=Upverter, ComponentLink5URL=https://datasheet.octopart.com:443/INA219AIDCNR-Texas-Instruments-datasheet-102489495.pdf?src-supplier=Upverter, ComponentLink6Description=https://datasheet.octopart.com:443/INA219AIDCNR-Texas-Instruments-datasheet-11538655.pdf?src-supplier=Future+Electronics, ComponentLink6URL=https://datasheet.octopart.com:443/INA219AIDCNR-Texas-Instruments-datasheet-11538655.pdf?src-supplier=Future+Electronics, ComponentLink7Description=https://datasheet.octopart.com:443/INA219AIDCNR-Texas-Instruments-datasheet-137316104.pdf?src-supplier=Future+Electronics, ComponentLink7URL=https://datasheet.octopart.com:443/INA219AIDCNR-Texas-Instruments-datasheet-137316104.pdf?src-supplier=Future+Electronics, ComponentLink8Description=https://datasheet.octopart.com:443/INA219AIDCNR-Texas-Instruments-datasheet-24897021.pdf?src-supplier=element14+APAC, ComponentLink8URL=https://datasheet.octopart.com:443/INA219AIDCNR-Texas-Instruments-datasheet-24897021.pdf?src-supplier=element14+APAC, ComponentLink9Description=https://datasheet.octopart.com:443/INA219AIDCNR.-Texas-Instruments-datasheet-62277359.pdf?src-supplier=element14+APAC, ComponentLink9URL=https://datasheet.octopart.com:443/INA219AIDCNR.-Texas-Instruments-datasheet-62277359.pdf?src-supplier=element14+APAC, ComponentLink10Description=https://datasheet.octopart.com:443/INA219AIDCNR-Texas-Instruments-datasheet-164414650.pdf?src-supplier=SHENGYU+ELECTRONICS, ComponentLink10URL=https://datasheet.octopart.com:443/INA219AIDCNR-Texas-Instruments-datasheet-164414650.pdf?src-supplier=SHENGYU+ELECTRONICS, ComponentLink11Description=https://datasheet.octopart.com:443/INA219AIDCNR-Texas-Instruments-datasheet-159115060.pdf?src-supplier=LCSC, ComponentLink11URL=https://datasheet.octopart.com:443/INA219AIDCNR-Texas-Instruments-datasheet-159115060.pdf?src-supplier=LCSC, ComponentLink12Description=https://datasheet.octopart.com:443/INA219AIDCNR-Texas-Instruments-datasheet-140571431.pdf?src-supplier=Arrow.cn, ComponentLink12URL=https://datasheet.octopart.com:443/INA219AIDCNR-Texas-Instruments-datasheet-140571431.pdf?src-supplier=Arrow.cn, ComponentLink13Description=https://datasheet.octopart.com:443/INA219AIDCNR-Texas-Instruments-datasheet-14155040.pdf?src-supplier=iiiC, ComponentLink13URL=https://datasheet.octopart.com:443/INA219AIDCNR-Texas-Instruments-datasheet-14155040.pdf?src-supplier=iiiC, ComponentLink14Description=http://sigma.octopart.com:80/reach_statement/Texas-Instruments-company-64.pdf?src-supplier=Compliance+Statements, ComponentLink14URL=http://sigma.octopart.com:80/reach_statement/Texas-Instruments-company-64.pdf?src-supplier=Compliance+Statements, ComponentLink15Description=http://sigma.octopart.com:80/conflict_mineral_statement/Texas-Instruments-company-63.pdf?src-supplier=Compliance+Statements, ComponentLink15URL=http://sigma.octopart.com:80/conflict_mineral_statement/Texas-Instruments-company-63.pdf?src-supplier=Compliance+Statements, Contact Plating=Gold, Features=I²C, Height=1.45mm, Lead Free="Lead Free", Length=2.9mm, Lifecycle Status=Production, Manufacturer Part Number=INA219AIDCNR, Number of Amplifiers=1, Number of Outputs=1, Output Current per Channel=10mA, Output Type=Digital, Packaging="Cut Tape", Pins=8, Pricing="1=2.25, 10=1.662, 25=1.5144, 100=1.3524, 250=1.2752, 500=1.23256, 1000=1.1628 (USD)", Quiescent Current=700µA, Radiation Hardening=No, REACH SVHC=Unaffected, RoHS=Compliant, Schedule B="8542330000|8542330000|8542330000, 8542330000|8542330000|8542330000|8542330000|8542330000", Stock=58711, Supplier=DigiKey, Thickness=1.1mm, Weight=40.001177mg, Width=1.63mm
U3: "Unchecked KH-TYPE-C-16P 3A 1 Horizontal attachment 16P Female -40℃~+85℃ Type-C SMD USB Connectors ROHS Uncategorized"
U4: "USB Connector, 24 Contact(s), Female, Right Angle, Surface Mount Terminal, Plug", Contact Resistance=50mΩ, Current Rating=5A, Dielectric Material="Liquid Crystal Polymer", Insulation Color=Black, Insulation Resistance=100MΩ, Manufacturer="Global Connector Technology", Max Operating Temperature=85°C, Min Operating Temperature=-30°C, Supplier Part Number=2073-USB4155-03-CDKR-ND, Voltage Rating=20V, Category="USB Connectors", China RoHS=Compliant, ComponentLink1Description=https://datasheet.octopart.com:443/USB4155-03-C-GCT-datasheet-166933378.pdf?src-supplier=IHS, ComponentLink1URL=https://datasheet.octopart.com:443/USB4155-03-C-GCT-datasheet-166933378.pdf?src-supplier=IHS, ComponentLink2Description=https://datasheet.octopart.com:443/USB4155-03-C-GCT-datasheet-169726654.pdf?src-supplier=Future+Electronics, ComponentLink2URL=https://datasheet.octopart.com:443/USB4155-03-C-GCT-datasheet-169726654.pdf?src-supplier=Future+Electronics, ComponentLink3Description=https://datasheet.octopart.com:443/USB4155-03-C-Global-Connector-Technology-datasheet-152746743.pdf?src-supplier=Future+Electronics, ComponentLink3URL=https://datasheet.octopart.com:443/USB4155-03-C-Global-Connector-Technology-datasheet-152746743.pdf?src-supplier=Future+Electronics, ComponentLink4Description=https://datasheet.octopart.com:443/USB4155-03-C-GCT-datasheet-188945506.pdf?src-supplier=TME, ComponentLink4URL=https://datasheet.octopart.com:443/USB4155-03-C-GCT-datasheet-188945506.pdf?src-supplier=TME, ComponentLink5Description=https://datasheet.octopart.com:443/USB4155-03-C-GCT-datasheet-166929330.pdf?src-supplier=TME, ComponentLink5URL=https://datasheet.octopart.com:443/USB4155-03-C-GCT-datasheet-166929330.pdf?src-supplier=TME, Contact Material="Gold, Nickel", Gender=Female, Height=2.1mm, Lifecycle Status=Production, Manufacturer Part Number=USB4155-03-C, Number of Contacts=24, Number of Ports=1, Number of Positions=24, Number of Rows=2, Orientation="Right Angle", Pins=24, Plating Thickness=76.2nm, Pricing="1=1.66, 10=1.407, 25=1.3188, 50=1.2556, 100=1.1956, 250=1.12064, 500=1.06712 (USD)", REACH SVHC=Unaffected, RoHS=Compliant, Row Spacing=1.5mm, Shell Finish=Nickel, Shell Material="Stainless Steel", Stock=15032, Supplier=DigiKey, Terminal Pitch=500µm
U5: library part DM-OLED096-636
U6: "DC-DC Switching Step-Down Regulator, Fixed, 3.8V to 32V in, 3.3V out, 2A out, TSOT-26-6", Ambient Temperature Range High=85°C, Case/Package=VSSOP, Manufacturer="Diodes Inc.", Max Junction Temperature (Tj)=160°C, Max Output current=2A, Max Output Voltage=3.33V, Max Supply Voltage=32V, Max Switching Frequency=1.1MHz, Min Input Voltage=3.8V, Min Operating Temperature=-40°C, Min Output Voltage=3.27V, Nominal Output Voltage=3.3V, Nominal Supply Current=22µA, Nominal Supply Voltage=12V, Supplier Part Number=621-AP63203WU-7, Category="Voltage Regulators - Switching", China RoHS=Compliant, ComponentLink1Description=https://datasheet.octopart.com:443/AP63203WU-7-Diodes-Inc.-datasheet-130008827.pdf?src-supplier=IHS, ComponentLink1URL=https://datasheet.octopart.com:443/AP63203WU-7-Diodes-Inc.-datasheet-130008827.pdf?src-supplier=IHS, ComponentLink2Description=https://sigma.octopart.com:443/138799930/technical_drawing/Diodes-Inc.-AP63203WU-7.pdf?src-supplier=Diodes+Inc+SCT, ComponentLink2URL=https://sigma.octopart.com:443/138799930/technical_drawing/Diodes-Inc.-AP63203WU-7.pdf?src-supplier=Diodes+Inc+SCT, Country of Origin="Mainland China", Export Control Classification Number (ECCN) Code=EAR99, Harmonized Tariff Schedule (HTS) Code=8542.39.00.60, Height=1mm, Height - Seated (Max)=1mm, Introduction Date=2019-01-10, Length=2.9mm, Lifecycle Status=Production, Manufacturer Part Number=AP63203WU-7, Max Operating Temperature=85°C, Min Supply Voltage=3.8V, Number of Circuits=1, Number of Outputs=1, Number of Terminals=6, Output Current=2A, Output Voltage=3.3V, Pricing="1=0.91, 10=0.67, 50=0.558, 100=0.513, 1000=0.513, 10000=0.411 (USD)", REACH SVHC=Unaffected, RoHS=Compliant, Stock=397, Supplier=Mouser, Switching Frequency=1.1MHz, Terminal Pitch=950µm, Topology=Buck, Width=1.6mm
Y1: library part ABM10-16.000MHZ-D30-T3, "Crystal 16MHz ±20ppm (Tol) ±30ppm (Stability) 10pF FUND 150Ohm 4-Pin Ultra Mini-CSMD T/R", Case/Package=CSMD, ESR (Equivalent Series Resistance)=150Ω, Frequency Stability=30ppm, Frequency Tolerance=0.002%, Load Capacitance=10pF, Manufacturer=Abracon, Max Operating Temperature=85°C, Min Operating Temperature=-40°C, Supplier Part Number=535-10923-6-ND, Category=Crystals, China RoHS=Compliant, ComponentLink1Description=https://datasheet.octopart.com:443/ABM10-16.000MHZ-D30-T3-Abracon-datasheet-41232962.pdf?src-supplier=TME, ComponentLink1URL=https://datasheet.octopart.com:443/ABM10-16.000MHZ-D30-T3-Abracon-datasheet-41232962.pdf?src-supplier=TME, ComponentLink2Description=https://datasheet.octopart.com:443/ABM10-16.000MHZ-D30-T3-Abracon-datasheet-182204619.pdf?src-supplier=IHS, ComponentLink2URL=https://datasheet.octopart.com:443/ABM10-16.000MHZ-D30-T3-Abracon-datasheet-182204619.pdf?src-supplier=IHS, ComponentLink3Description=https://datasheet.octopart.com:443/ABM10-16.000MHZ-D30-T3-Abracon-datasheet-13380592.pdf?src-supplier=Upverter, ComponentLink3URL=https://datasheet.octopart.com:443/ABM10-16.000MHZ-D30-T3-Abracon-datasheet-13380592.pdf?src-supplier=Upverter, ComponentLink4Description=https://datasheet.octopart.com:443/ABM10-16.000MHZ-D30-T3-Abracon-datasheet-11045593.pdf?src-supplier=Upverter, ComponentLink4URL=https://datasheet.octopart.com:443/ABM10-16.000MHZ-D30-T3-Abracon-datasheet-11045593.pdf?src-supplier=Upverter, ComponentLink5Description=https://datasheet.octopart.com:443/ABM10-16.000MHZ-D30-T3-Abracon-datasheet-8882520.pdf?src-supplier=Upverter, ComponentLink5URL=https://datasheet.octopart.com:443/ABM10-16.000MHZ-D30-T3-Abracon-datasheet-8882520.pdf?src-supplier=Upverter, ComponentLink6Description=https://datasheet.octopart.com:443/ABM10-16.000MHZ-D30-T3-Abracon-datasheet-8456701.pdf?src-supplier=Upverter, ComponentLink6URL=https://datasheet.octopart.com:443/ABM10-16.000MHZ-D30-T3-Abracon-datasheet-8456701.pdf?src-supplier=Upverter, ComponentLink7Description=https://datasheet.octopart.com:443/ABM10-16.000MHZ-D30-T3-Abracon-datasheet-8326102.pdf?src-supplier=Upverter, ComponentLink7URL=https://datasheet.octopart.com:443/ABM10-16.000MHZ-D30-T3-Abracon-datasheet-8326102.pdf?src-supplier=Upverter, ComponentLink8Description=https://datasheet.octopart.com:443/ABM10-16.000MHZ-D30-T3-Abracon-datasheet-5401317.pdf?src-supplier=Upverter, ComponentLink8URL=https://datasheet.octopart.com:443/ABM10-16.000MHZ-D30-T3-Abracon-datasheet-5401317.pdf?src-supplier=Upverter, ComponentLink9Description=https://datasheet.octopart.com:443/ABM10-16.000MHZ-D30-T3-Abracon-datasheet-37124829.pdf?src-supplier=Newark, ComponentLink9URL=https://datasheet.octopart.com:443/ABM10-16.000MHZ-D30-T3-Abracon-datasheet-37124829.pdf?src-supplier=Newark, ComponentLink10Description=https://sigma.octopart.com:443/141159849/technical_drawing/Abracon-ABM10-16.000MHZ-D30-T3.pdf?src-supplier=Abracon+SCT, ComponentLink10URL=https://sigma.octopart.com:443/141159849/technical_drawing/Abracon-ABM10-16.000MHZ-D30-T3.pdf?src-supplier=Abracon+SCT, ComponentLink11Description=http://sigma.octopart.com:80/conflict_mineral_statement/Abracon-company-27.pdf?src-supplier=Compliance+Statements, ComponentLink11URL=http://sigma.octopart.com:80/conflict_mineral_statement/Abracon-company-27.pdf?src-supplier=Compliance+Statements, Country of Origin=Taiwan, Depth=2mm, Diameter=500µm, ESR=150Ω, Frequency=16MHz, Harmonized Tariff Schedule (HTS) Code=8541.60.00.50, Height=700µm, Height - Seated (Max)=500µm, Introduction Date=2012-05-08, Lead Free="Lead Free", Length=2.5mm, Lifecycle Status=Production, Manufacturer Part Number=ABM10-16.000MHZ-D30-T3, Mounting Technology="Surface Mount", Pins=4, Pricing="1=1.2, 10=1.044, 25=0.9876, 50=0.9468, 100=0.9076, 250=0.85828, 500=0.82278, 1000=0.78877 (USD)", REACH SVHC=Unaffected, RoHS=Compliant, Schedule B="8541600025, 8541600025|8541600025, 8541600025|8541600025|8541600025, 8541600025|8541600025|8541600025|8541600025", Stock=35847, Supplier=DigiKey, Termination=SMD/SMT, Tolerance=0.002%, Width=2mm

## Via types
v1: diameter 24, hole 12, Top Layer to Bottom Layer, 33 vias
v2: diameter 20, hole 10, Top Layer to Bottom Layer, 5 vias

## Nets (pads, with @x,y where several pads share a name; then routed paths per layer and width w, separated by ;. In a path a pad name is that pad's centre, name@x,y a point inside that pad or via, vN(x,y) a via of type N, cw(c..) or ccw(c..) an arc to the next point about the centre after c; other vN are vias at no path point)
+3.3V: C1.1 C2.2 C3.2 C4.2 C5.2 C6.1 C7.1 C11.2 C12.2 D3.A L1.2 R3.1 R4.1 U1.1 U1.9 U1.24 U1.36 U1.48 U2.4 U5.2 U6.1 | length 3916.6
  Top Layer w10: C2.2@840.55,340.55 910.67,410.67 910.67,461.85 949.61,500.79 U1.9 1051.18,500.79 1058.27,507.87 1058.27,518.9 1059.06,519.68 1059.06,631.5 1032.28,658.27 ; 956.69,665.35 963.78,658.27 U1.1 1032.28,658.27 ; U1.48 1043.31,714.25 1043.31,669.29 1032.28,658.27
  Top Layer w15: v1(129.92,228.35) 130.49,228.92 167.53,228.92 D3.A ; L1.2 838.58,846.46 868.11,816.93 ; U6.1 728.66,615.84 757.57,615.84 775.59,633.86 775.59,675.66 821.17,721.24 828.67,721.24 846.59,739.16 876.36,739.16 ; C11.2 748.03,347.37 v1(752.42,342.98) 756.82,338.58 C2.2 ; 956.69,665.35 945.87,676.17 916.35,676.17 C12.2 902.32,690.2 902.32,713.2 876.36,739.16 ; R4.1 1143.52,853.92 1143.52,868.29 1137.8,874.02 1137.8,895.08 1139.94,897.22 1139.94,910.32 1140.35,910.74 1140.35,935.63 1153.54,948.82 1185.04,948.82 ; 1188.98,944.88 1200.79,933.07 ; U1.24 1314.57,385.43 1334.65,405.51 1366.47,405.51 C6.1 ; C7.1 1365.61,353.25 1365.61,377.42 1366.14,377.95 1366.14,404.16 C6.1 ; C1.1 1381.49,803.15 1338.58,803.15 1329.51,812.22 1310.14,812.22 C5.2 ; 868.11,816.93 906.5,855.32 U2.4 977.36,855.32 988.19,866.14 988.19,957.48 U5.2 933.07,1023.62 996.06,1086.61 1156.57,1086.61 1200.79,1042.39 1200.79,933.07 ; 868.11,816.93 C3.2 876.36,751.59 876.36,739.16 ; 1200.79,933.07 1200.79,854.61 1234.92,820.47 C4.2 C5.2 ; C5.2 1301.89,765.04 1316.46,750.47 U1.36 1353.54,658.27 1369.29,642.52 1369.29,421.69 1369.15,421.55 1369.15,406.8 1367.35,405 C6.1
  Bottom Layer w15: v1(129.92,228.35) 637.8,228.35 v1(752.42,342.98)
BW: C13.1 U6.6 | length 106.6
  Top Layer w10: C13.1 529.53,622.05 562.99,622.05 572.84,612.2 U6.6
CC1: U3.A5 U4.A5 | length 1608.6
  Top Layer w10: U3.A5 v1(278.74,599.21) ; v1(1775.59,602.36) 1777.95,602.36 1795.86,584.45 U4.A5
  Bottom Layer w10: v1(278.74,599.21) 1743.59,599.21 1746.74,602.36 v1(1775.59,602.36)
CC2: U3.B5 U4.B5 | length 3169.7
  Top Layer w8: v2(1861.15,504.99) 1871.71,515.55 U4.B5
  Top Layer w10: U3.B5 v1(282.68,481.1)
  Bottom Layer w9.05: v2@1860.66,504.5 v2(1861.15,504.99)
  Bottom Layer w10: v1(282.68,481.1) 305.51,503.94 1002.6,503.94 1012.53,494.01 1014.05,494.01 1019.41,488.65 1019.41,462.1 1035.22,446.28 1045.12,446.28 1071.89,419.51 1071.89,257.81 1067.84,253.76 ccw(c1091.89,205) 1049.63,239.2 cw(c1041.89,245.54) 1034.15,239.2 ccw(c991.89,205) 949.63,239.2 cw(c941.89,245.54) 934.15,239.2 ccw(c891.89,205) 934.15,170.79 cw(c941.89,164.46) 949.63,170.79 ccw(c991.89,205) 1034.15,170.79 cw(c1041.89,164.46) 1049.63,170.79 ccw(c1091.89,205) 1134.15,170.79 cw(c1141.89,164.46) 1149.63,170.79 ccw(c1191.89,205) 1149.63,239.2 cw(c1141.89,245.54) 1134.15,239.2 ccw(c1091.89,205) 1121.15,250.82 1115.59,254.38 1111.89,258.08 1111.89,436.08 1073.41,474.56 1073.41,484.46 1068.07,489.79 1068.07,498.08 1071,501.01 1073.93,503.94 1688.98,503.94 1724.41,468.5 1824.66,468.5 v2@1860.66,504.5
D+: U3.A6 U3.B6 U4.A6 U4.B6 | length 2015.6
  Top Layer w10: U3.B6 189.76,520.47 188.98,519.68 181.1,527.56 v1(181.1,539.37) 181.1,551.18 188.54,558.62 231.69,558.62 U3.A6 ; v1(1732.28,511.81) 1784.92,564.45 1832.52,564.45 U4.A6 ; v2(1862.2,531.5) 1866.14,535.43 1877.5,535.43 1876.99,534.92 1891.58,534.92 U4.B6
  Bottom Layer w9.01: 1822.83,507.65 1846.68,531.5 v2(1862.2,531.5)
  Bottom Layer w10: v1(181.1,539.37) 260.87,539.37 268.34,531.9 290.71,531.9 298.18,539.37 1704.72,539.37 v1(1732.28,511.81) 1755.35,488.75 1803.93,488.75 1822.83,507.65
D-: U3.A7 U3.B7 U4.A7 U4.B7 | length 1773.7
  Top Layer w7.56: U4.A7 1856.1,545.08 1865.95,554.92 U4.B7
  Top Layer w10: U3.A7 262.98,540.16 272.44,540.16 279.53,547.24 v1(279.53,558.9) 279.53,570.55 270.55,579.53 U3.B7 ; v1(1767.72,515.75) 1767.72,519.54 1784.54,536.36 1784.54,536.51 1793.11,545.08 U4.A7
  Bottom Layer w10: v1(279.53,558.9) 280,559.37 1724.09,559.37 v1(1767.72,515.75) v1@1769.05,515.75
GND: C1.2 C2.1 C3.1 C4.1 C5.1 C6.2 C7.2 C8.1 C9.1 C10.1 C11.1 C12.1 C14.2 J1.4 R2.1 R5.1 U1.8 U1.23 U1.35 U1.47 U2.3 U2.7 U2.8 U4.A1 U4.A12 U4.B1 U4.B12 U4.S1 U4.S2 U5.1 U6.4 Y1.2 Y1.4 | length 1822.1
  Top Layer w8: v1(708.57,465.21) 705.51,468.28 705.51,488.63 682.51,511.62 682.51,528.83 C10.1 675.91,557.8 v2(697.83,579.72) Y1.2 ; v1(823.5,681.85) 800.88,659.23 800.88,628.74 792.1,619.96 792.1,584.41 787.42,579.72 Y1.2 ; Y1.4 821.85,530.51 802.39,549.98 800.3,549.98 790.02,560.26 780.29,560.26 760.83,579.72 Y1.2 ; J1.4 1240.47,253.58 v1(1240.47,334.65) ; U4.S1 1824.96,444.75 1826.87,446.65 U4.A12 ; U4.A1 1834.74,661.28 1854.46,661.28 v2(1862.2,653.54) U4.B12@1891.89,653.54
  Top Layer w10: C14.2@570.99,421.26 C14.2@572.28,419.97 ; v1@824.8,680.56 C12.1@852.48,680.56 ; C12.1 859.53,673.94 C9.1 ; v1(889.6,879.5) 891.01,880.91 U2.3@942.05,880.91 ; 930.94,513.94 937.47,520.47 U1.8 ; C4.1@1236.22,883.12 C4.1@1238.86,880.47 ; C5.1@1301.86,880.47 C5.1@1303.15,881.77 ; U4.B1 1891.89,411.26 v2(1897.64,405.51)
  Top Layer w15: v1(153.54,141.73) 154.87,143.05 189.07,143.05 R5.1 ; v1(541.22,421.26) C14.2@570.99,421.26 ; U6.4 v1@629.31,725.15 ; v1@709.89,466.54 C11.1 ; v1(779.53,759.84) C3.1@807.09,759.84 ; C8.1 828.74,387.79 850.05,409.1 870.92,409.1 v1(872.64,410.82) 872.64,455.64 930.94,513.94 ; C9.1@858.38,626.1 885.71,626.1 v1(885.83,626.21) ; C2.1 v1@937.75,338.58 ; R2.1@921.26,755.91 v1@921.26,794.05 ; U2.7 v1@1083.61,906.5 ; U2.8 1046.45,933.06 1074.79,933.06 v1(1075.76,934.03) ; U1.47 1063.31,676.85 v1(1074.8,665.35) ; C4.1@1236.22,883.12 v1(1236.22,913.39) ; v1(1240.47,334.65) U1.23 ; v1(1263.78,649.61) 1274.8,638.58 U1.35 ; C5.1@1303.15,881.77 v1(1303.15,917.32) ; C1.2@1380.6,896.22 v1(1380.6,926.68) ; C6.2 v1@1434.94,405 ; C7.2 v1@1454.56,345
  Bottom Layer w8: J1.4 1191.89,211.57 J1.4@1212.6,232.28
  other v1: 939.07,339.9 1455.88,346.32 1436.26,406.32 627.99,726.47 919.94,795.37 1084.94,907.82
I2C1_SCL: R3.2 U1.42 U2.5 U5.3 | length 601.3
  Top Layer w10: U2.5 1045.47,828.54 v1(1062.99,811.02) ; U1.42 v1(1161.73,809.88) 1174.61,822.76 R3.2@1174.61,897.64
  Bottom Layer w10: U5.3 1022.05,926.77 1138.94,809.88 ; v1(1062.99,811.02) 1063.56,810.45 1138.94,810.45 1161.16,810.45 v1(1161.73,809.88)
I2C1_SDA: R4.2 U1.43 U2.6 U5.4 | length 443.7
  Top Layer w10: U2.6 1046.61,879.76 1065.3,879.76 1082.36,862.7 1082.36,837.14 1112.79,806.71 ; U5.4 1122.05,1010.26 1106.3,994.51 1106.3,863.06 1106.77,862.59 1106.77,857.2 1112.79,851.18 1112.79,806.71 ; U1.43 1142.36,714.88 1142.36,759.94 1141.73,760.57 1141.73,777.78 1112.79,806.71
NetC8_2: C8.2 U1.7 | length 198.9
  Top Layer w10: C8.2 828.74,446.85 921.42,539.53 945.67,539.53 ; 945.67,540.16 U1.7
NetC9_2: C9.2 U1.5 Y1.1 | length 210.5
  Top Layer w10: C9.2 825.51,581.42 Y1.1 939.96,579.72 940.16,579.53 U1.5
NetC10_2: C10.2 U1.6 Y1.3 | length 315.1
  Top Layer w10: C10.2 753.94,535.43 Y1.3 ; Y1.3@760.83,530.51 791.57,499.76 850.16,499.76 909.92,559.53 987.01,559.53 U1.6
NetD2_2: D2.2 J1.1 | length 118.3
  Top Layer w15: D2.2 839.55,240.16 874.71,205 J1.1
NetD3_C: D3.C R5.2 | length 89.1
  Top Layer w10: R5.2 220.02,188.52 228.35,196.85 228.35,228.3 D3.C
NetR1_2: R1.2 U2.2 U3.A4B9 U3.A9B4 | length 3524.9
  Top Layer w8: 176.05,634.98 200.65,634.98 203.47,637.8 203.91,637.8 205.92,639.8